# Altium PCB B049-140W-3C1A 外挂FTF屏1.3寸-显示屏板.PcbDoc
Units mm, origin at the board's own origin, x right, y up, seen from the top; angles counter-clockwise.
Board outline 24.73 x 27.02 mm, 2 copper layers (Top Layer, Bottom Layer), stack 1.031 mm thick; 39 components, 212 nets, 131 pads, 145 vias.
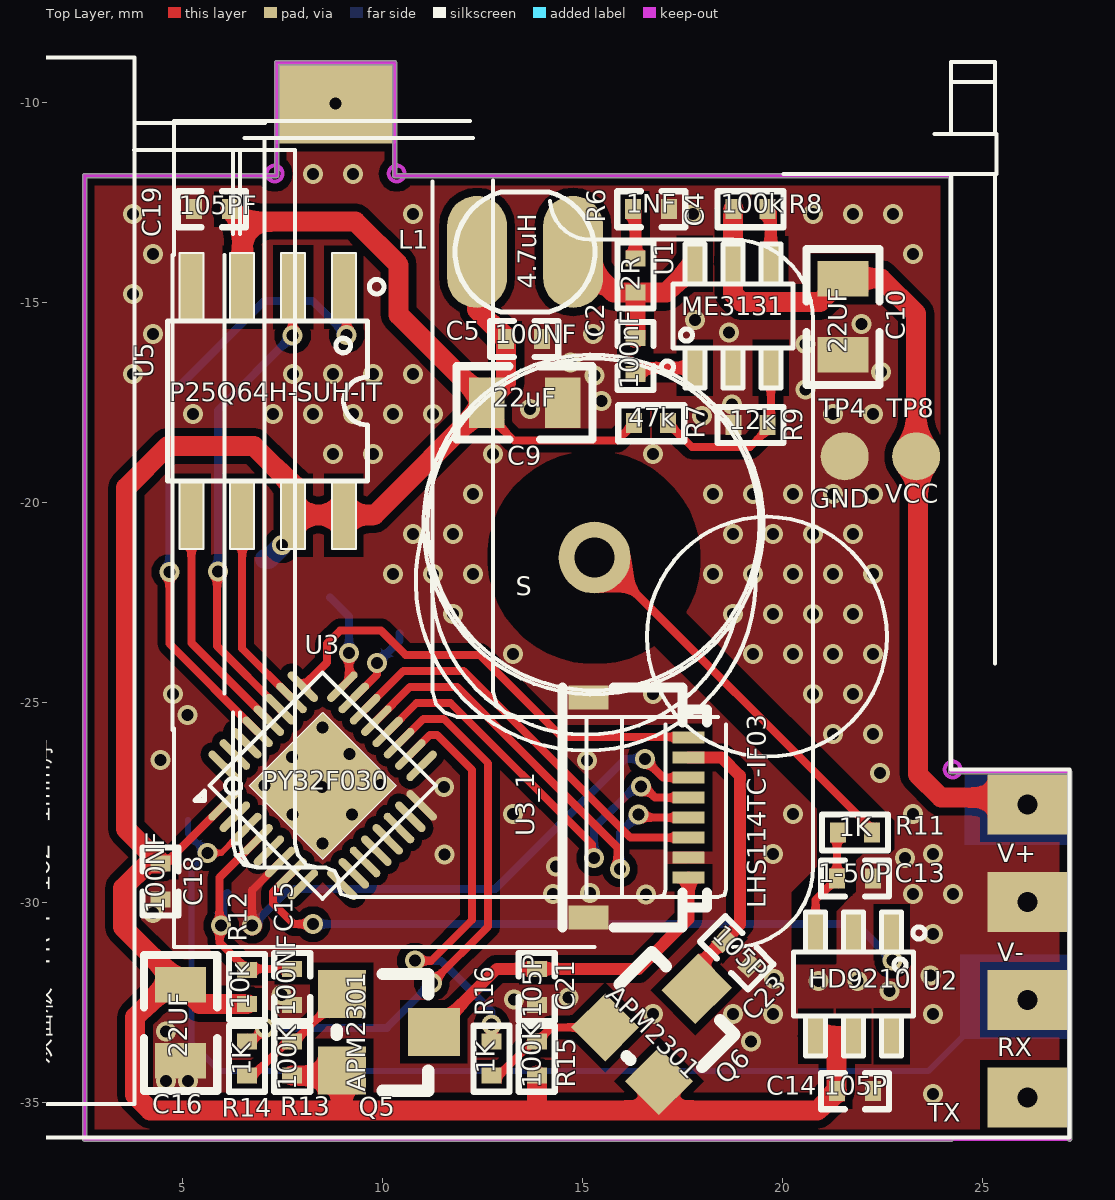
[diagram p0: Top Layer view]
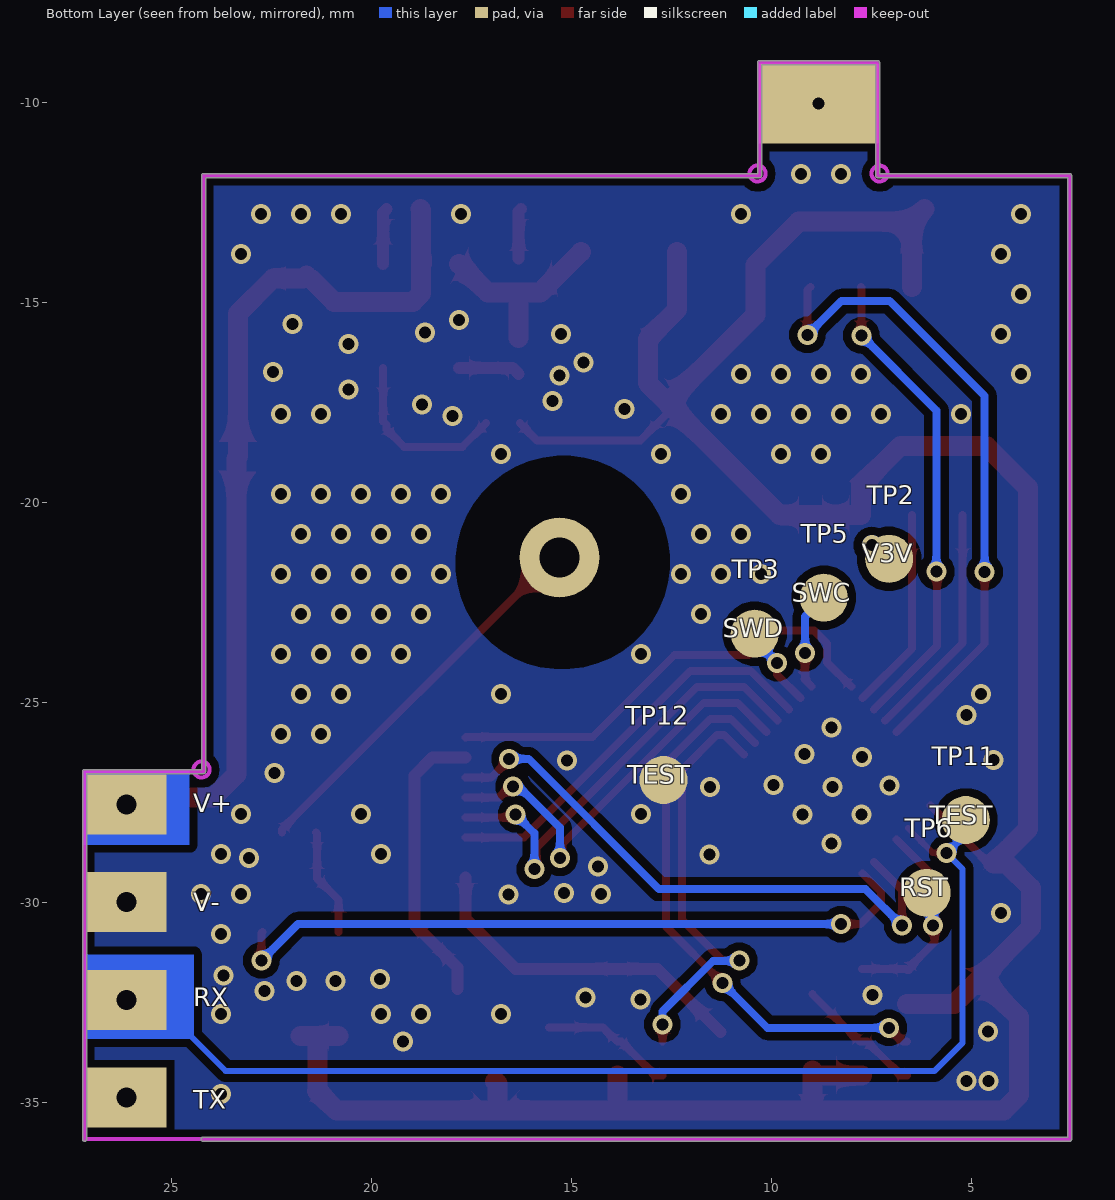
[diagram p1: Bottom Layer view, seen from below]

## Layer stack, top to bottom
Top Solder: solder mask 0.0102, Solder Resist, Dk 3.5
Top Layer: signal copper 0.0356
Dielectric 1: dielectric 0.32, FR-4, Dk 4.8
Dielectric2: dielectric 0.32, FR-4, Dk 4.8
Dielectric3: dielectric 0.32, FR-4, Dk 4.8
Bottom Layer: signal copper 0.0356
Bottom Solder: solder mask 0.0102, Solder Resist, Dk 3.5

## Board outline
2.548,-35.96 cw(c2.548,-35.91) 2.498,-35.91 2.498,-11.818 cw(c2.548,-11.818) 2.548,-11.768 7.298,-11.768 7.298,-8.993 cw(c7.348,-8.993) 7.348,-8.943 10.298,-8.943 cw(c10.298,-8.993) 10.349,-8.993 10.349,-11.768 24.198,-11.768 cw(c24.198,-11.818) 24.249,-11.818 24.249,-26.668 27.173,-26.668 cw(c27.173,-26.718) 27.224,-26.718 27.224,-35.91 cw(c27.173,-35.91) 27.123,-35.91 27.123,-26.769 24.198,-26.769 cw(c24.198,-26.718) 24.148,-26.718 24.148,-11.869 10.298,-11.869 cw(c10.298,-11.818) 10.248,-11.818 10.248,-9.044 7.399,-9.044 7.399,-11.818 cw(c7.348,-11.818) 7.348,-11.869 2.599,-11.869 2.599,-35.86 24.21,-35.86 cw(c24.21,-35.91) 24.26,-35.91 cw(c24.21,-35.91) 24.21,-35.96

## Design rules (kind name [scope] priority, off if disabled: settings)
Clearance [All] p1: gap=0.2 ignorepadtopadclearanceinfootprint=FALSE
ComponentClearance [All] p1: gap=0.05 collisioncheckmode=3 verticalgap=0.05 showdistances=FALSE
PlaneConnect [All] p1: planeconnectstyle=Direct reliefexpansion=0.508 reliefentries=4 reliefconductorwidth=0.254 reliefairgap=0.254
PolygonConnect [All] p1: connectstyle=Direct reliefconductorwidth=0.254 reliefentries=4 polygonreliefangle="90 Angle" airgapwidth=0.254
RoutingVias [All] p1: holewidth=0.3 width=0.5 viastyle="Through Hole" minholewidth=0.3 minwidth=0.5 maxholewidth=0.3 maxwidth=0.5
SolderMaskExpansion [All] p1: expansion=0.102 istentingtop=FALSE
Width [All] p1: maxlimit=1 minlimit=0.1 preferedwidth=0.2 minimp=50.000000 maximp=50.000000 favimp=50.000000
28 further rules are at their usual default settings.

## Components (designator, comment, footprint, x,y, rotation, side; value= is the part's Value field where it differs from the comment)
C2 "100nF" "C 0402_L" 16.32,-16.33 r270 top
C4 "1NF" "C 0402_L" 16.715,-12.66 r180 top
C5 "100NF" "C 0402_L" 13.54,-15.9 r180 top
C9 "22uF" "C 0805_L" 13.55,-17.5 r180 top
C10 "22UF" "C 0805_L" 21.51,-15.35 r270 top
C13 "1-50P" "C 0402_L" 21.808,-29.39 r180 top
C14 "105P" "C 0402_L" 21.808,-34.71 r0 top
C15 "100NF" "C 0402_L" 7.74,-32.1 r90 top
C16 "22UF" "C 0805_L" 4.95,-33 r90 top
C18 "100NF" "C 0402_L" 4.45,-29.47 r90 top
C19 "105PF" "C 0402_L" 5.73,-12.66 r180 top
C21 "105P" "C 0402_L" 13.853,-32.1 r90 top
C23 "105P" "C 0402_L" 18.852,-31.252 r135 top
L1 "4.7uH" CD32 13.55,-13.72 r180 top
Q5 "APM2301" SOT23-MOS 9.64,-33.151 r270 top
Q6 "APM2301" SOT23-MOS 16.64,-33.26 r315 top
R6 "2R" "R 0402_L" 16.32,-14.29 r270 top
R7 "47k" "R 0402_L" 16.74,-18.01 r180 top
R8 "100k" "R 0402_L" 19.22,-12.66 r180 top
R9 "12k" "R 0402_L" 19.17,-18.05 r0 top
R11 "1K" "R 0402_L" 21.783,-28.24 r0 top
R12 "10k" "R 0402_L" 6.61,-32.075 r270 top
R13 "100K" "R 0402_L" 7.74,-33.873 r270 top
R14 "1K" "R 0402_L" 6.61,-33.873 r270 top
R15 "100K" "R 0402_L" 13.854,-33.873 r270 top
R16 "1K" "R 0402_L" 12.724,-33.873 r270 top
TP2 "V3V" 焊盘1.5*2.5mm 7.06,-21.4 r180 bottom
TP3 "SWD" 焊盘1.5*2.5mm 10.42,-23.27 r180 bottom
TP4 "GND" 焊盘1.5*2.5mm 21.55,-18.84 r0 top
TP5 "SWC" 焊盘1.5*2.5mm 8.69,-22.37 r180 bottom
TP6 "RST" 焊盘1.5*2.5mm 6.12,-29.75 r180 bottom
TP8 "VCC" 焊盘椭圆 23.34,-18.84 r0 top
TP11 "TEST" 焊盘椭圆 5.14,-27.93 r180 bottom
TP12 "TEST" 焊盘椭圆 12.7,-26.93 r180 bottom
U1 "ME3131" SOT23-6 18.77,-15.33 r90 top
U2 "HD9210" SOT23-6 21.76,-32.03 r270 top
U3 "PY32F030" "QFN32 4*4" 6.025,-27.565 r315 top
U3_1 "LHS114TC-IF03" FPC-SMD_8P-P0.BD_FPC-SMD_8P-P0.BD() 16.398,-27.618 r90 top locked (schematic designator U3)
U5 "P25Q64H-SUH-IT" SOP8 7.2,-17.48 r270 top

## Footprints (in the part's own frame and the unit in brackets; to place one, negate y for a bottom-side part, rotate by r counter-clockwise, add the part's x,y. Pads: shape width x height; smd on the part's side, far side on the other; paste and mask are expansions set on the pad)
"C 0402_L" [mm] "无极性贴片电容         淘宝ID:黄晶宝石"
  rect 0.4x0.5 smd: 1(-0.45,0) 2(0.45,0)
  silkscreen extent -0.85,-0.45 0.85,0.45, body extent -0.5,-0.26 0.5,0.26, height 0.53
"C 0805_L" [mil] "无极性贴片电容                                        淘宝ID:黄晶宝石"
  rect 35x50 smd: 1(-37.4,0) 2(37.4,0)
  silkscreen extent -67,-36 67,36, body extent -39,-24 39,24, height 20
CD32 [mm]
  oval 1.5x2.8 smd: 1(-1.21,0.008) 2(1.19,0.008)
  silkscreen extent -1.76,-1.49 1.74,1.51, body extent -1.78,-1.52 1.63,1.48, height 2.15
FPC-SMD_8P-P0.BD_FPC-SMD_8P-P0.BD() [mm]
  rect 0.3x0.8 smd: 1(-1.75,-1.25) 2(-1.25,-1.25) 3(-0.75,-1.25) 4(-0.25,-1.25) 5(0.25,-1.25) 6(0.75,-1.25) 7(1.25,-1.25) 8(1.75,-1.25)
  rect 0.6x1 smd: 9(-2.75,1.25) 10(2.75,1.25)
  silkscreen extent -3,-1.71 3,1.91
"QFN32 4*4" [mm]
  oval 0.2x1 smd: 1(0,0) 2(0.4,0) 3(0.8,0) 4(1.2,0) 5(1.6,0) 6(2,0) 7(2.4,0) 8(2.8,0) 17(2.8,4.2) 18(2.4,4.2) 19(2,4.2) 20(1.6,4.2) 21(1.2,4.2) 22(0.8,4.2) 23(0.4,4.2) 24(0,4.2)
  oval 1x0.2 smd: 9(3.5,0.7) 10(3.5,1.1) 11(3.5,1.5) 12(3.5,1.9) 13(3.5,2.3) 14(3.5,2.7) 15(3.5,3.1) 16(3.5,3.5) 25(-0.7,3.5) 26(-0.7,3.1) 27(-0.7,2.7) 28(-0.7,2.3) 29(-0.7,1.9) 30(-0.7,1.5) 31(-0.7,1.1) 32(-0.7,0.7)
  rect 2.6x2.6 smd: 33(1.4,2.1)
  silkscreen extent -0.6,-0.42 3.4,4.1, body extent -0.59,0.09 3.41,4.09, height 0.57
"R 0402_L" [mm] "1/16W贴片电阻     淘宝ID:黄晶宝石"
  rect 0.4x0.5 smd: 1(-0.4,0) 2(0.45,0)
  silkscreen extent -0.8,-0.45 0.85,0.45, body extent -0.5,-0.25 0.5,0.25, height 0.3
SOP8 [mm]
  rect 1.7x0.6 smd: 1(-2.875,1.83) 2(-2.875,0.56) 3(-2.875,-0.71) 4(-2.875,-1.98) 5(2.825,-1.98) 6(2.825,-0.71) 7(2.825,0.56) 8(2.825,1.83)
  silkscreen extent -3.73,-2.58 3.68,2.83, body extent -3.01,-2.52 2.99,2.38, height 1.7
SOT23-6 [mm]
  rect 1x0.5 smd: 1(-1.298,0.964) 2(-1.298,0.014) 3(-1.298,-0.936) 4(1.302,-0.936) 5(1.302,0.014) 6(1.302,0.964)
  silkscreen extent -1.8,-1.49 1.8,1.8, body extent -1.16,-1.37 1.26,1.43, height 1.09
SOT23-MOS [mm]
  rect 1.2x1.3 smd: D(0.075,1.64)
  rect 1.2x1.2 smd: G(-0.865,-0.66) S(1.04,-0.66)
  silkscreen extent -1.37,-0.79 1.55,1.5, body extent -1.41,-0.79 1.59,1.76, height 1
焊盘1.5*2.5mm [mm]
  round 1.2 smd: 1(0,0)
焊盘椭圆 [mm]
  round 1.2 smd: 1(0,0)

## Part data
C2: library part 22nF, "贴片电容：100NF/25V-X7R-0402", Contributor=LCEDA_Lib, nameAlias=Value(F), spicePre=C, spiceSymbolName=C_0603_US
C4: library part C0402, "贴片电容：1NF/50V-X7R-0402", Comment_1=C0402, PCB DECAL=0402
C5 C18: library part 0.1u, "贴片电容：100NF/10V-X5R-0402", Add into BOM=yes, Convert to PCB=yes, Device=0.1u, FootprintName=C0603, ModelId=ac9b32e974bc448eab36b1293f859dcb, ModelName=C0603_L1.6-W0.8-H0.8, ModelTransform=v2:[39.37007874015748,0,0,0,39.37007874015748,0,0,0,39.37007874015748,0.001,0,0], SymbolName=0.1u
  C5: UniqueId=ggeef7817906d228245
  C18: UniqueId=gge4f251fc7ae9908d9
C9: "贴片电容：22UF/10V-X7R-0805", Contributor=LCEDA_Lib, nameAlias=Value(F), spicePre=C, spiceSymbolName=C_0805_US
C10: library part 10uF, "贴片电容：22UF/35V-X7R-0805", Contributor=LCEDA_Lib, nameAlias=Value(F), spicePre=C, spiceSymbolName=C_0603_US
C13 C14 C21 C23: library part CAP, "贴片电容：105P/10V-X5R-0402"
C15: library part 10uF, "贴片电容：100NF/10V-X7R-0805", Add into BOM=yes, Convert to PCB=yes, Device=10uF, FootprintName=C0603, ModelId=ac9b32e974bc448eab36b1293f859dcb, ModelName=C0603_L1.6-W0.8-H0.8, ModelTransform=v2:[39.37007874015748,0,0,0,39.37007874015748,0,0,0,39.37007874015748,0.001,0,0], SymbolName=10uF, UniqueId=gge1e13a888c85ebaed
C16: library part 10uF, "贴片电容：22UF/10V-X7R-0805", Add into BOM=yes, Convert to PCB=yes, Device=10uF, FootprintName=C0603, ModelId=ac9b32e974bc448eab36b1293f859dcb, ModelName=C0603_L1.6-W0.8-H0.8, ModelTransform=v2:[39.37007874015748,0,0,0,39.37007874015748,0,0,0,39.37007874015748,0.001,0,0], SymbolName=10uF, UniqueId=gge2649e10512dd5dd7
C19: library part 0.1u, "贴片电容：105P/10V-X5R-0402", Add into BOM=yes, Convert to PCB=yes, Device=0.1u, FootprintName=C0603, ModelId=ac9b32e974bc448eab36b1293f859dcb, ModelName=C0603_L1.6-W0.8-H0.8, ModelTransform=v2:[39.37007874015748,0,0,0,39.37007874015748,0,0,0,39.37007874015748,0.001,0,0], SymbolName=0.1u, UniqueId=ggeeecb535e2993774a
L1: "贴片电感：0420-4.7UH", Manufacturer=Sunlord, Manufacturer Part=MPH252012S4R7MT, nameAlias=Inductance, spicePre=L, spiceSymbolName=MPH252012S4R7MT, Supplier=LCSC, Supplier Part=C90256
Q5 Q6: library part MOS_P, "贴片MOS：APM2301-SOT23-3"
R6: library part R0402, "贴片电阻：2R-0402-F", Comment_1=R0402, PCB DECAL=0402
R7: library part 75k, "贴片电阻：47K-0402-1%", Contributor=LCEDA_Lib, nameAlias=Value(Ω), spicePre=R, spiceSymbolName=R_0603_US
R8: "贴片电阻：100K-0402-1%", Contributor=LCEDA_Lib, nameAlias=Value(Ω), spicePre=R, spiceSymbolName=R_0603_US
R9: library part 10k, "贴片电阻：12K-0402-1%", Contributor=LCEDA_Lib, nameAlias=Value(Ω), spicePre=R, spiceSymbolName=R_0603_US
R11 R14 R16: library part R, "贴片电阻：1K-0402-F"
R12: "贴片电阻：10K-0402-F", Add into BOM=yes, Convert to PCB=yes, Device=10k, FootprintName=R0603, ModelId=6bd5cd867e9542ebae21caaf5d2d4c4d, ModelName=R0603, ModelTransform=v2:[2.410722045565656e-15,39.37007874015748,0,-39.37007874015748,2.410722045565656e-15,0,0,0,39.37007874015748,0,0,0], SymbolName=10k, UniqueId=gged69dc30bc6f01ca4
R13 R15: library part R, "贴片电阻：100K-0402-F"
TP2 TP3 TP4 TP5 TP6: library part TP
TP8: library part TEST, PCB DECAL=TPSM
U1: library part TD8113, "贴片IC：ME3131-SOT23-6", LCSC Assembly=Yes, Manufacturer=TMI, Manufacturer Part=STI3470, Contributor=wwjlisa, link=unknown, SMT Type=Extend, spicePre=U, spiceSymbolName=STI3470, Supplier=LCSC, Supplier Part=C478938
U2: library part SOT23-MCU, "贴片触摸：HD9210-SOT23-6"
U3: library part PY32F031, "贴片IC：PY32F030-QFN32-4*4", JLCPCB Part Class="Extended Part", Manufacturer=PUYA(普冉), Manufacturer Part=PY32F030K28U6TR, Add into BOM=yes, Convert to PCB=yes, Device=PY32F031, FootprintName=QFN-32_L5.0-W5.0-P0.50-TL-EP3.5, ModelId=595304ab79a843bfa03bdaf869386976, ModelName=QFN-32_L5.0-W5.0-H1.0-P0.50-TL-EP3.5, ModelTransform=v2:[39.37007874015748,0,0,0,39.37007874015748,0,0,0,39.37007874015748,0.001,0,0], Supplier=LCSC, Supplier Part=C3018718, SymbolName=PY32F031, UniqueId=gge62ac414b3116667d
U5: JLCPCB Part Class="Extended Part", Manufacturer=PUYA(普冉), Add into BOM=yes, Convert to PCB=yes, Device=P25Q64H-SUH-IT, FootprintName=SOP-8_L5.3-W5.3-P1.27-LS8.0-BL, Manufacturer Part=P25Q64H-SUH-IT, ModelId=fc9b9a2dc0bb4458871072ce0a00885d, ModelName=SOP-8_L5.2-W5.3-H2.1-LS7.9-P1.27, ModelTransform=v2:[2.410722045565656e-15,39.37007874015748,0,-39.37007874015748,2.410722045565656e-15,0,0,0,39.37007874015748,0,0,0], Supplier=LCSC, Supplier Part=C414065, SymbolName=P25Q64H-SUH-IT, UniqueId=ggeec8bb7aad7322074
TP11 TP12: PCB DECAL=TPSM

## Free pads (board coordinates)
  rect 3x2 hole 0.3 mask+0.102: 2(8.823,-10.018)
  rect 2x1.5 hole 0.5 mask+0.102: 2(26.123,-34.868) 2(26.123,-32.424) 2(26.123,-29.98)
  rect 2x1.5 hole 0.5: 2(26.123,-27.536)
  round 1.8 / inner round 1.8 / far side round 2 hole 1: 5(15.298,-21.368)

## Via types
v1: diameter 0.5, hole 0.3, Top Layer to Bottom Layer, tented both sides, 145 vias

## Nets (pads, with @x,y where several pads share a name; then routed paths per layer and width w, separated by ;. In a path a pad name is that pad's centre, name@x,y a point inside that pad or via, vN(x,y) a via of type N, cw(c..) or ccw(c..) an arc to the next point about the centre after c; other vN are vias at no path point)
AGND: 
BACK_LED: R14.1 U3.19 | length 14.2
  Top Layer w0.2: R14.1 6.717,-33.473 v1(7.065,-33.126) ; U3.19 11.019,-25.4 11.527,-25.4 12.64,-26.513 12.64,-30.59 v1(11.23,-32)
  Bottom Layer w0.2: v1(7.065,-33.126) 10.104,-33.126 v1(11.23,-32)
BOOT0: U3.31
BST1: 
BST1-1: 
BST2: 
BST2-1.: 
BST3: 
BUTTON: U2.1 U3.7 | length 17.7
  Top Layer w0.2: U3.7 7.26,-29.724 7.26,-30.012 7.778,-30.53 v1(8.26,-30.53) ; U2.1 22.75,-30.758 v1(22.75,-31.44)
  Bottom Layer w0.2: v1(8.26,-30.53) 21.84,-30.53 v1(22.75,-31.44)
CC1-1: 
CC1-2: 
CC1-3: 
CC1_1: 
CC1_2: 
CC1_3: 
CC1_4: 
CC2-1: 
CC2-2: 
CC2-3: 
CC2_1: 
CC2_2: 
CC2_3: 
CC2_4: 
COMP: 
COMP1: 
CSN: 
CSP2: 
CSP3: 
CSP_1: 
CSP_2: 
CSP_3: 
CSP_4: 
D25_EN: U3.14
D25_INT: U3.15
D31_CSP1: 
D31_CSP2: 
D31_EN1: U3.11
D31_EN2: U3.10
D31_INT1: U3.13
D31_INT2: U3.12
D31_VOUT1: 
D31_VOUT2: 
DM-1: 
DM-2: 
DM-3: 
DM-4: 
DM_1: 
DM_2: 
DM_3: 
DM_4: 
DN0: 
DN1: 
DN2: 
DN3: 
DP0: 
DP1: 
DP2: 
DP3: 
DP-1: 
DP-2: 
DP-3: 
DP-4: 
DP_1: 
DP_2: 
DP_3: 
DP_4: 
DRV_C1: 
DRV_C2: 
DRV_C3: 
DRV_C4: 
EN1: 
EN1-1: 
EN2: 
EN-2: 
FB11: 
FB_1: 
FB_2: 
FB_3: 
FLASH_CLK: U3.26 U5.6 | length 5.1
  Top Layer w0.2: U5.6 6.49,-23.646 U3.26
FLASH_CS: U3.29 U5.1 | length 16.3
  Top Layer w0.2: v1(4.67,-21.73) 4.67,-23.523 U3.29 ; U5.1 9.1,-14.675 v1(9.1,-15.8)
  Bottom Layer w0.2: v1(4.67,-21.73) 4.67,-17.33 7.05,-14.95 8.25,-14.95 v1(9.1,-15.8)
FLASH_MISO: U3.27 U5.2 | length 12
  Top Layer w0.2: v1(5.88,-21.72) 5.86,-21.74 5.86,-23.581 U3.27 ; v1(7.751,-15.816) 7.751,-14.614 U5.2
  Bottom Layer w0.2: v1(5.88,-21.72) 5.88,-17.69 7.751,-15.819 v1(7.751,-15.816)
FLASH_MOSI: U3.28 U5.5 | length 5.9
  Top Layer w0.2: U5.5 5.22,-23.507 U3.28
G0: 
G1: 
G2: 
G3: 
GND: C4.1 C5.1 C9.1 C10.2 C13.1 C14.2 C15.1 C16.1 C18.1 C19.2 C21.1 C23.1 pad.2@26.123,-29.98 R9.1 TP4.1 TP12.1 U1.2 U2.2 U3.16 U3.33 U3_1.2 U3_1.9 U3_1.10 U5.4
  other v1: 23.76,-34.78 5.13,-34.46 4.58,-34.45 19.21,-33.47 4.59,-33.22 16.76,-32.78 18.76,-32.78 19.76,-32.78 23.76,-32.78 13.28,-32.42 14.65,-32.37 7.47,-32.31 22.67,-32.2 20.9,-31.96 21.87,-31.96 19.79,-31.9 23.7,-31.82 23.76,-30.78 4.26,-30.26 16.58,-29.79 14.26,-29.78 23.26,-29.78 24.26,-29.78 15.19,-29.75 14.34,-29.09 23.06,-28.88 11.55,-28.79 19.76,-28.78 23.76,-28.78 8.5,-28.52 7.75,-27.79 9.23,-27.79 13.26,-27.78 20.26,-27.78 23.26,-27.78 8.48,-27.1 11.54,-27.11 7.05,-27.07 9.95,-27.06 22.43,-26.76 15.11,-26.44 4.45,-26.43 7.74,-26.36 9.17,-26.28 21.26,-25.78 22.26,-25.78 8.5,-25.62 5.12,-25.3 4.76,-24.78 16.76,-24.78 20.76,-24.78 21.76,-24.78 13.26,-23.78 19.26,-23.78 20.26,-23.78 21.26,-23.78 22.26,-23.78 11.76,-22.78 18.76,-22.78 19.76,-22.78 20.76,-22.78 21.76,-22.78 10.26,-21.78 11.26,-21.78 12.26,-21.78 18.26,-21.78 19.26,-21.78 20.26,-21.78 21.26,-21.78 22.26,-21.78 10.76,-20.78 11.76,-20.78 18.76,-20.78 19.76,-20.78 20.76,-20.78 21.76,-20.78 12.26,-19.78 18.26,-19.78 19.26,-19.78 20.26,-19.78 21.26,-19.78 22.26,-19.78 8.76,-18.78 9.76,-18.78 12.76,-18.78 16.76,-18.78 17.98,-17.83 5.26,-17.78 7.26,-17.78 8.26,-17.78 9.26,-17.78 10.26,-17.78 11.26,-17.78 21.26,-17.78 22.26,-17.78 13.68,-17.66 18.74,-17.54 15.47,-17.46 20.57,-17.17 15.3,-16.82 3.76,-16.78 7.76,-16.78 8.76,-16.78 9.76,-16.78 10.76,-16.78 22.46,-16.73 14.7,-16.49 20.57,-16.03 4.26,-15.78 15.26,-15.78 18.66,-15.74 21.97,-15.53 17.81,-15.43 3.76,-14.78 4.26,-13.78 23.26,-13.78 3.76,-12.78 10.76,-12.78 17.76,-12.78 20.76,-12.78 21.76,-12.78 22.76,-12.78 8.26,-11.78 9.26,-11.78
GND_C1: 
GND_C2: 
GND_C4: 
HG1: 
HG2: 
I2C_SCL: pad.2@26.123,-32.424 TP11.1 U3.3 | length 29.1
  Top Layer w0.15: v1(5.62,-28.76) 5.63,-28.75 5.971,-28.75 U3.3
  Bottom Layer w0.15: TP11.1 5.14,-28.28 v1(5.62,-28.76) 5.22,-29.16 5.22,-33.5 5.92,-34.2 23.65,-34.2 24.986,-32.864 25.683,-32.864 pad.2@26.123,-32.424
I2C_SDA: U3.2
IFB1: 
IFB2: 
IFB3: 
IFB3-1: 
IIC_SCL: 
IIC_SDA: 
LCD_CLK: U3.6 U3_1.6 | length 14.7
  Top Layer w0.2: v1@6.74,-30.597 v1(6.74,-30.57) 6.74,-29.678 U3.6 ; v1(16.56,-26.4) 16.56,-26.422 17.006,-26.868 U3_1.6
  Bottom Layer w0.2: v1(6.74,-30.57) 7.65,-29.66 12.81,-29.66 16.07,-26.4 v1(16.56,-26.4)
LCD_CS: U3.25 U3_1.8 | length 11.6
  Top Layer w0.2: U3.25 8.61,-23.99 8.61,-23.52 8.94,-23.19 9.96,-23.19 10.57,-23.8 12.42,-23.8 14.47,-25.85 17.63,-25.85 U3_1.8
LCD_DC: U3.21 U3_1.4 | length 11.5
  Top Layer w0.2: U3.21 10.687,-24.6 11.859,-24.6 15.873,-28.614 15.873,-29.103 v1(15.93,-29.16) ; v1(16.396,-27.793) 16.477,-27.793 16.551,-27.868 U3_1.4
  Bottom Layer w0.2: v1(15.93,-29.16) 15.93,-28.259 v1(16.396,-27.793)
LCD_EN2: R16.1 U3.18 | length 10.9
  Top Layer w0.2: U3.18 11.184,-25.8 11.362,-25.8 12.24,-26.678 12.24,-30.424 11.214,-31.45 10.81,-31.45 v1(10.804,-31.444) ; R16.1 12.724,-33.043 v1(12.727,-33.039)
  Bottom Layer w0.2: v1(10.804,-31.444) 10.81,-31.45 11.458,-31.45 12.727,-32.72 v1(12.727,-33.039)
LCD_MOSI: U3.20 U3_1.5 | length 11
  Top Layer w0.2: U3.20 10.853,-25 11.693,-25 15.231,-28.538 15.231,-28.823 v1(15.288,-28.88) ; v1(16.457,-27.096) 16.538,-27.096 16.81,-27.368 U3_1.5
  Bottom Layer w0.2: v1(15.288,-28.88) 15.288,-28.123 16.315,-27.096 v1(16.457,-27.096) v1@16.399,-27.154
LCD_RES: U3.22 U3_1.3 | length 10.2
  Top Layer w0.2: U3.22 10.521,-24.2 12.024,-24.2 16.193,-28.368 U3_1.3
LCD_TE: U3.17
LEDA: C21.2 Q5.D U3_1.1 | length 8.6
  Top Layer w0.3: Q5.D 12.855,-31.65 C21.2 16.4,-31.65 17.648,-30.402 U3_1.1
LG1: 
LG2: 
NetC2_1: C2.1 L1.1 R6.2 U1.6 | length 4.9
  Top Layer w0.5: L1.1 15.772,-14.74 R6.2 ; C2.1 R6.2 ; U1.6 17.094,-14.74 R6.2
NetC2_2: C2.2 U1.1 | length 1.5
  Top Layer w0.3: C2.2 16.472,-16.628 U1.1
NetC4_2: C4.2 R6.1 | length 1.3
  Top Layer w0.3: C4.2 16.32,-12.715 R6.1
NetC8_2: 
NetC12_2: 
NetC13_2: C13.2 R11.1 U2.3 | length 2.7
  Top Layer w0.2: U2.3 20.824,-29.924 C13.2 21.358,-28.265 R11.1
NetC15_2: 
NetC24_2: 
NetC26_2: 
NetC67_2: 
NetC72_2: 
NetC73_2: 
NetC90_1: 
NetC91_1: 
NetC94_1: 
NetC95_1: 
NetC96_1: 
NetC96_2: 
NetC97_1: 
NetC97_2: 
NetL2_1: 
NetQ5_G: Q5.G R13.1 R14.2 | length 3.2
  Top Layer w0.2: R14.2 6.757,-34.323 7.607,-33.473 R13.1 7.792,-33.473 Q5.G
NetQ6_G: Q6.G R15.1 R16.2 | length 3.3
  Top Layer w0.2: R16.2 12.897,-34.323 13.747,-33.473 R15.1 14.212,-33.115 Q6.G
NetR1_1: 
NetR5_1: 
NetR7_1: R7.1 R9.2 U1.3 | length 4.5
  Top Layer w0.2: R7.1 17.73,-18.6 19.19,-18.6 19.62,-18.17 R9.2 19.706,-17.964 U1.3
NetR8_1: R8.1 U1.4 | length 1.4
  Top Layer w0.3: R8.1 19.706,-12.746 U1.4
NetR11_2: pad.5 R11.2 | length 9.8
  Top Layer w0.2: pad.5 15.438,-21.368 22.233,-28.163 R11.2
NetR19_2: 
NetR55_1: 
NetR56_1: 
NetR76_1: 
NetR77_1: 
NetRT1_1: 
NetU2_14: 
NetU4_46: 
NTC1: 
NTC1-1: 
OPTO1: 
OPTO2: 
OPTO3: 
P0_CC1: 
P0_CC2: 
P1_CC1: 
P1_CC2: 
P2_CC1: 
P2_CC2: 
P3_CC1: 
P3_CC2: 
PB7: U3.30
PB8: U3.32
PD14: 
PF3: U3.5
PFC: 
PFC-FB: 
PLUG1: 
PLUG2: 
PLUG2-1: 
QB1: 
QB2: 
QE1: 
QE2: 
RESET: 
RST: C15.2 R12.1 TP6.1 U3.4 | length 6.8
  Top Layer w0.2: U3.4 5.92,-29.367 5.92,-30.53 v1(5.96,-30.57) 5.921,-30.609 5.921,-30.986 6.46,-31.525 6.46,-31.575 6.56,-31.675 R12.1 6.635,-31.65 C15.2
  Bottom Layer w0.2: TP6.1 TP6.1@6.017,-29.853 ; TP6.1@6.017,-29.853 5.96,-29.91 v1(5.96,-30.57) 6.017,-30.513 TP6.1@6.017,-29.853
RX: U3.9
SD59D31_INT: 
SW1: 
SW1-1: 
SW2: 
SW2-1: 
SW3: 
SW3-1: 
SWCLK: TP5.1 U3.24 | length 2.5
  Top Layer w0.2: U3.24 9.18,-24.41 9.16,-24.39 v1(9.16,-23.76)
  Bottom Layer w0.2: TP5.1 9.16,-22.84 v1(9.16,-23.76)
SWDIO: TP3.1 U3.23 | length 2.1
  Top Layer w0.2: U3.23 9.859,-24.297 v1(9.859,-24.008)
  Bottom Layer w0.2: v1(9.859,-24.008) 10.42,-23.447 TP3.1
TX: U3.8
VBUS1: 
VBUS2: 
VBUS3: 
VBUS4: 
VBUS_C1: 
VBUS_C2: 
VBUS_C3: 
VBUS_C4: 
VCC5V: 
VCC_1: 
VCC_2: 
VCC_3: 
VDD: C23.2 Q6.D U3_1.7 | length 7.2
  Top Layer w0.3: U3_1.7@17.648,-26.368 18.478,-26.368 18.93,-26.82 18.93,-30.537 C23.2 17.853,-31.615 Q6.D
VDD5: 
VFB1: 
VFB2: 
VFB3: 
VFB3-1: 
VIN: 
VIN+: C10.1 pad.2@26.123,-27.536 R8.2 TP8.1 U1.5 | length 22.2
  Top Layer w0.5: U1.5@18.74,-14.028 18.74,-13.87 U1.5@18.75,-13.86 ; R8.2 18.756,-12.674 U1.5 18.756,-14.766 18.968,-14.978 20.932,-14.978 C10.1 ; C10.1@21.63,-14.32 21.7,-14.39 22.46,-14.39 23.34,-15.27 TP8.1 ; TP8.1@23.38,-18.89 23.38,-26.79 23.958,-27.368 25.806,-27.368 25.806,-27.218 pad.2@26.123,-27.536
VIN-1: 
VIN-2: 
VIN_1: 
VIN_2: 
VIN_3: 
VIN_3V: C5.2 C9.2 C14.1 C16.2 C18.2 C19.1 L1.2 Q5.S Q6.S R7.2 R12.2 R13.2 R15.2 TP2.1 U2.4 U2.5 U3.1 U5.3 U5.7 U5.8 | length 77.4
  Top Layer w0.2: C18.2 4.57,-29.02 U3.1 ; C9.2 12.6,-17.76 13.28,-18.44 15.86,-18.44 R7.2
  Top Layer w0.5: C19.1 6.49,-12.97 ; U5.3 6.49,-12.97 ; R12.2 5.425,-32.525 C16.2 ; R13.2 8.847,-34.323 Q5.S 8.98,-35.18 8.99,-35.19 ; L1.2 12.36,-15.17 C5.2 13.09,-17.01 C9.2 ; R15.2 13.854,-35.166 13.83,-35.19 ; Q6.S 16.85,-34.521 Q6.S@16.85,-35.19 ; U2.4 21.451,-33.332 ; C14.1@21.352,-34.703 21.352,-33.432 21.451,-33.332 ; C14.1 20.878,-35.19 Q6.S@16.85,-35.19 ; U2.5 21.451,-33.332 ; C16.2 4.62,-32.05 3.81,-32.86 3.81,-34.81 4.19,-35.19 8.99,-35.19 ; C16.2 3.51,-30.61 3.51,-29.63 4.12,-29.02 C18.2 3.59,-28.16 3.59,-19.62 4.63,-18.58 6.78,-18.58 7.76,-19.56 U5.7 U5.8 9.795,-20.305 C9.2 ; 6.49,-12.97 9.32,-12.97 10.4,-14.05 10.4,-15.3 C9.2 ; 8.99,-35.19 13.83,-35.19 ; 13.83,-35.19 Q6.S@16.85,-35.19
  Bottom Layer w0.5: TP2.1 7.15,-21.4 v1(7.49,-21.06)
VOUT4: 
pads on no net: U2.6

## Polygon pours and split planes (outlines as drawn)
LCD_CLK on Top Layer "LCD_CLK_L01_P069" (solid, remove dead copper, pour order 69): 7.24,-28.15 6.023,-29.367 5.92,-29.367 5.92,-31.271 5.916,-31.275 7.06,-31.275 7.32,-31.015 7.32,-28.32
GND on Top Layer "GND_L01_P067" (solid, remove dead copper, pour order 67): 0.58,-5.03 0.99,-5.44 0.99,-37.9 27.32,-37.9 28.21,-38.79 28.21,-4.83
GND on Bottom Layer "GND_L02_P068" (solid, remove dead copper, pour order 68): 1.5,-8.36 1.5,-36.48 2.6,-37.58 28.71,-37.58 28.71,-8.32 28.61,-8.22
no net on Bottom Solder "Bottom Layer-No Net" (hatched 90Degree grid 0.8 track 0.3, remove dead copper): -18.965,38.79 -18.965,52.215 -16.415,52.215 1.76,52.215 1.76,50.715 1.76,44.265 1.21,44.265 0.46,44.265 0.46,44.765 ccw(c-0.144,44.765) 0.283,45.192 -1.215,46.69 -1.246,46.721 ccw(c-3.042,44.925) -3.042,47.465 -10.665,47.465 ccw(c-10.665,46.89) -11.24,46.89 -11.24,46.04 ccw(c-10.232,46.04) -10.232,45.032 -10.09,45.032 -9.282,45.032 cw(c-9.282,44.515) -8.765,44.515 -8.765,43.515 ccw(c-6.665,43.515) -6.665,41.415 -6.265,41.415 ccw(c-6.265,43.14) -4.54,43.14 -4.54,45.04 cw(c-4.015,45.04) -4.015,45.565 -3.59,45.565 cw(c-3.59,44.515) -2.54,44.515 -2.54,40.015 cw(c-2.64,40.015) -2.64,39.915 -2.765,39.915 ccw(c-2.765,38.965) -3.715,38.965 cw(c-3.94,38.965) -3.94,38.74 -5.19,38.74 -7.915,38.74 ccw(c-7.915,37.215) -9.44,37.215 -9.44,36.465 cw(c-9.915,36.465) -9.915,35.99 ccw(c-9.915,34.865) -11.04,34.865 -11.04,31.465 -11.04,31.09 cw(c-11.465,31.09) -11.465,30.665 -15.441,30.665 cw(c-15.441,31.689) -16.165,30.965 ccw(c-16.527,30.603) -16.527,31.115 -17.34,31.115 cw(c-17.34,31.715) -17.94,31.715 -17.94,31.89 -17.94,33.962 cw(c-16.062,33.962) -17.39,35.29 -17.286,35.394 ccw(c-18.182,36.29) -16.915,36.29 ccw(c-17.532,36.29) -17.532,36.907 -17.94,36.907 -18.965,36.907
no net on Bottom Solder "Bottom Layer-No Net" (hatched 90Degree grid 0.8 track 0.3, remove dead copper): 1.76,44.633 1.76,39.387 cw(c0.138,39.387) 1.285,38.24 ccw(c2.251,37.274) 0.885,37.274 0.885,36.965 0.885,32.266 cw(c-0.566,32.266) 0.46,31.24 0.323,31.103 cw(c-0.915,32.34) -0.915,30.59 -7.465,30.59 -7.465,31.265 -7.465,31.815 -6.79,31.815 -5.865,31.815 ccw(c-5.865,32.765) -4.915,32.765 -4.915,36.611 cw(c-4.061,36.611) -4.665,37.215 ccw(c-5.027,37.577) -4.515,37.577 -4.515,38.015 -4.515,38.905 cw(c-4.43,38.905) -4.49,38.965 -3.715,38.965 -3.715,33.74 ccw(c-2.415,33.74) -2.415,32.44 ccw(c-2.415,33.14) -1.715,33.14 -1.715,33.49 ccw(c-2.5,33.49) -1.945,34.045 -1.965,34.065 cw(c-1.543,34.487) -2.14,34.487 -2.14,35.34 -2.14,39.352 ccw(c-2.703,39.352) -2.703,39.915 ccw(c-2.703,40.077) -2.54,40.077 -2.54,42.233 -2.54,43.833 -2.383,43.833 cw(c-2.383,43.64) -2.19,43.64 -2.19,43.415 ccw(c-0.94,43.415) -0.94,42.165 ccw(c-0.94,43.59) 0.485,43.59 0.485,43.865 0.485,44.608 ccw(c0.46,44.608) 0.46,44.633

## Keep-outs
Keep-Out Layer:
  circle w0.1: c7.298,-11.768 r0.2
  circle w0.1: c10.348,-11.768 r0.2
  circle w0.1: c24.248,-26.668 r0.2
  lines w0.1: 2.548,-35.91 24.21,-35.91 27.173,-35.91 27.173,-26.718 24.198,-26.718 24.198,-11.818 10.298,-11.818 10.298,-8.993 7.348,-8.993 7.348,-11.818 2.548,-11.818 2.548,-35.91

## Other copper
Top Layer:
  pour cut-out: 12.614,-21.353 ccw(c15.289,-21.353) 15.289,-24.028 15.327,-24.028 ccw(c15.327,-21.397) 17.958,-21.397 ccw(c15.264,-21.397) 15.264,-18.703 ccw(c15.264,-21.353)
  pour cut-out: 16.792,-23.589 20.85,-27.647 20.85,-29.1 20.22,-29.73 20.22,-31.51 20.26,-31.55 21.31,-31.55 21.35,-31.51 21.35,-30.21 21.84,-29.72 21.84,-28.94 22,-28.78 22.68,-28.78 22.8,-28.66 22.8,-27.95 17.606,-22.756 17.606,-22.713 16.792,-23.526
Bottom Layer:
  rectangle net VIN+: 24.55,-28.55 27.22,-26.71
  rectangle net I2C_SCL: 24.44,-33.41 27.16,-31.29
  pour cut-out: 12.547,-21.478 ccw(c15.222,-21.478) 15.222,-24.153 15.261,-24.153 ccw(c15.261,-21.523) 17.892,-21.523 ccw(c15.197,-21.523) 15.197,-18.828 ccw(c15.197,-21.478)

## Silkscreen, mask and mechanical layers (free items; w line width, h text height)
Top Overlay:
  drawing of 152 lines, arcs and shapes, not listed
  text "S" at 13.323,-22.468 h0.8
  text "V+" at 25.36,-29.143 h0.8
  text "V-" at 25.36,-31.618 h0.8
  text "RX" at 25.36,-34.001 h0.8
  text "双面板   FR-4   1OZ   1mm厚" at 1.843,-34.024 h0.8 r90
  text "TX" at 23.623,-35.635 h0.8
Bottom Overlay:
  text "V+" at 24.461,-27.893 h0.8
  text "V-" at 24.461,-30.368 h0.8
  text "RX" at 24.461,-32.751 h0.8
  text "TX" at 24.461,-35.311 h0.8
Top Solder:
  lines w1.5: 1.06,37.357 1.06,43.282